# Altium PCB EMBL51537_SC_BOARD.PcbDoc (part 1 of 2)
Units mil, origin at the board's own origin, x right, y up, seen from the top; angles counter-clockwise.
Board outline 4527.6 x 6358.3 mil, 4 copper layers (TOP, L2_PWR, L3_GND, BOTTOM), stack 20.602 mil thick; 126 components, 64 nets, 342 pads, 137 vias.
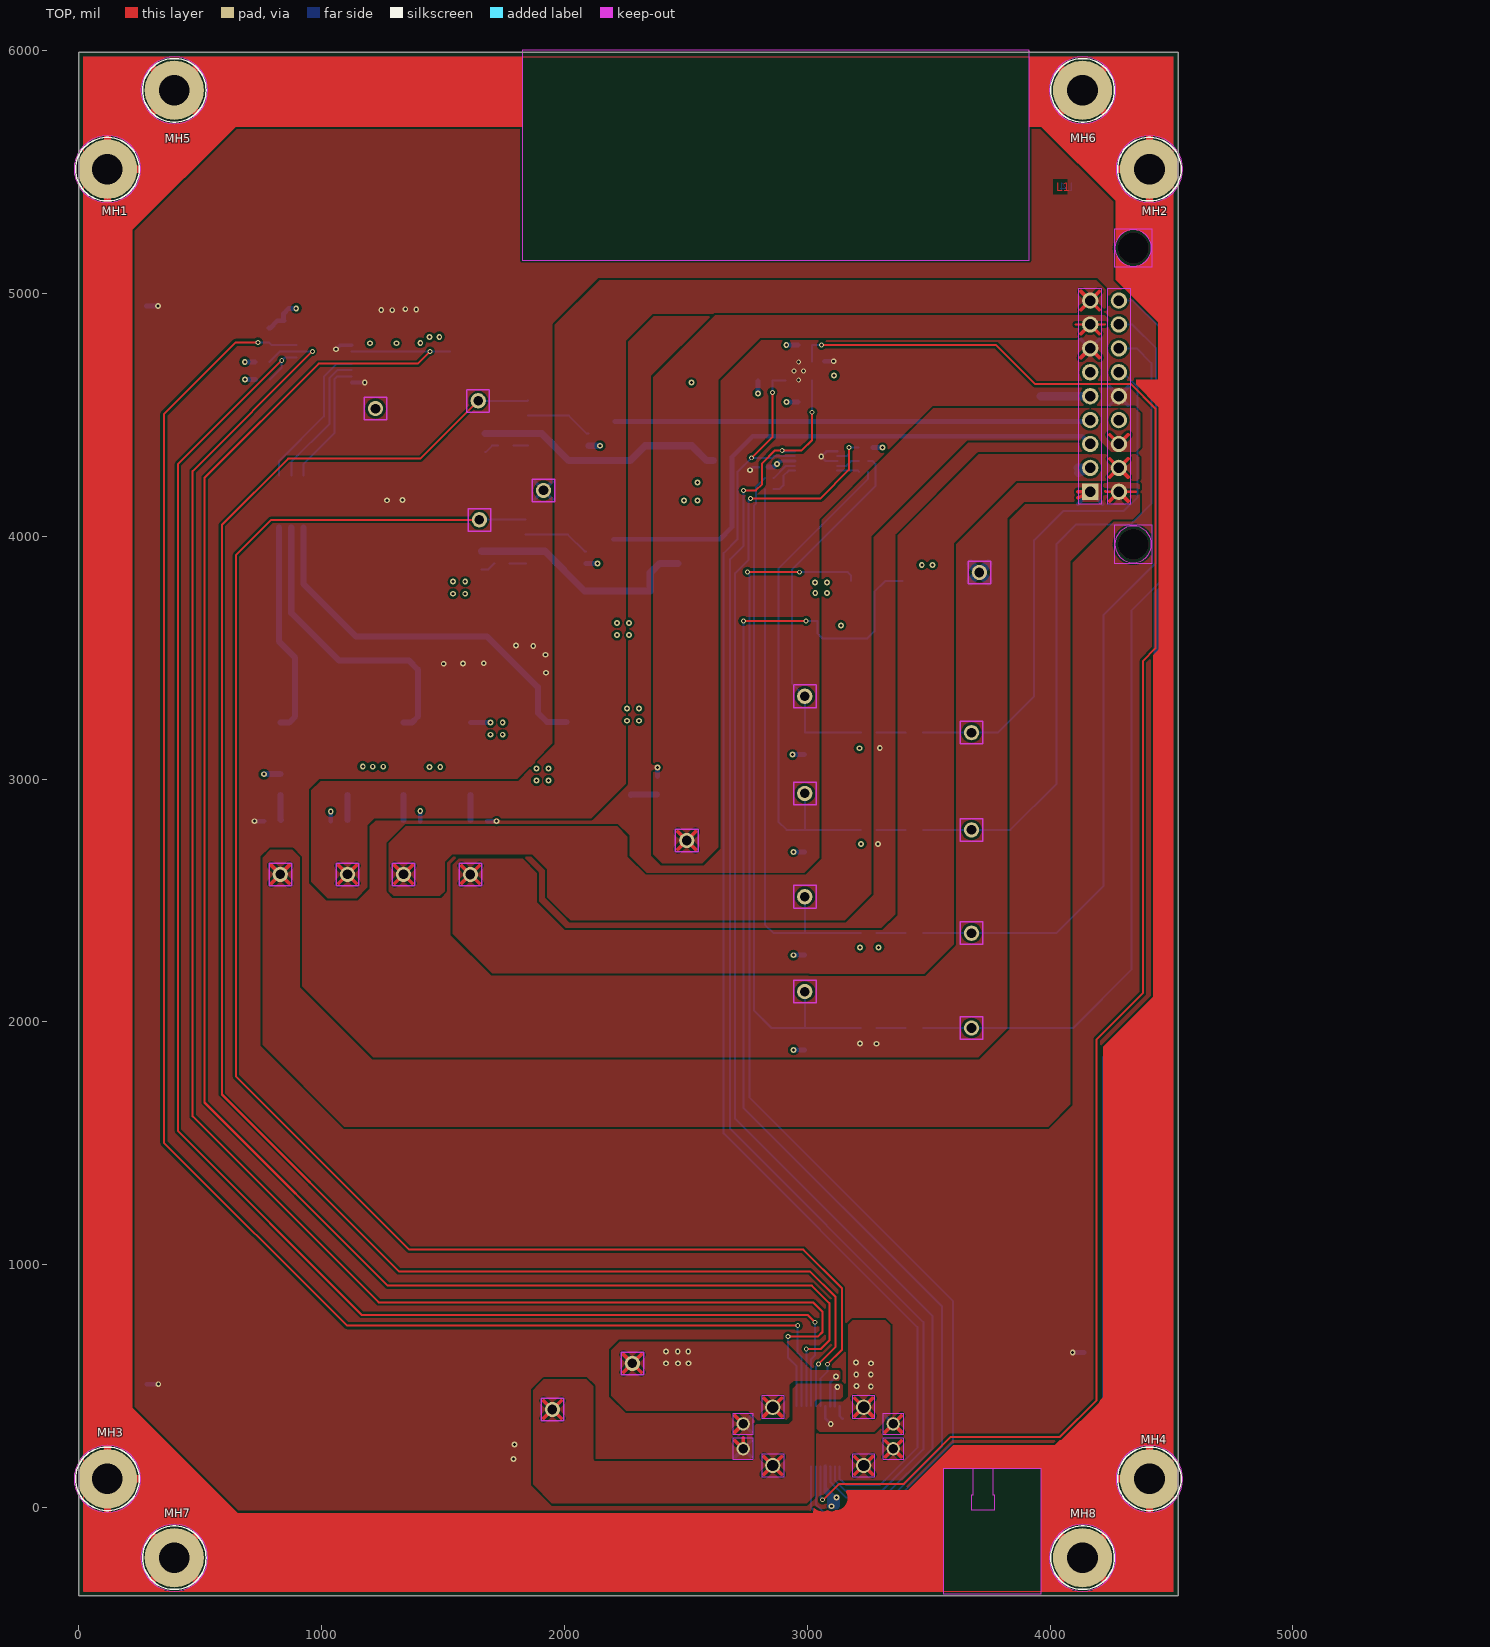
[diagram p0: TOP view]
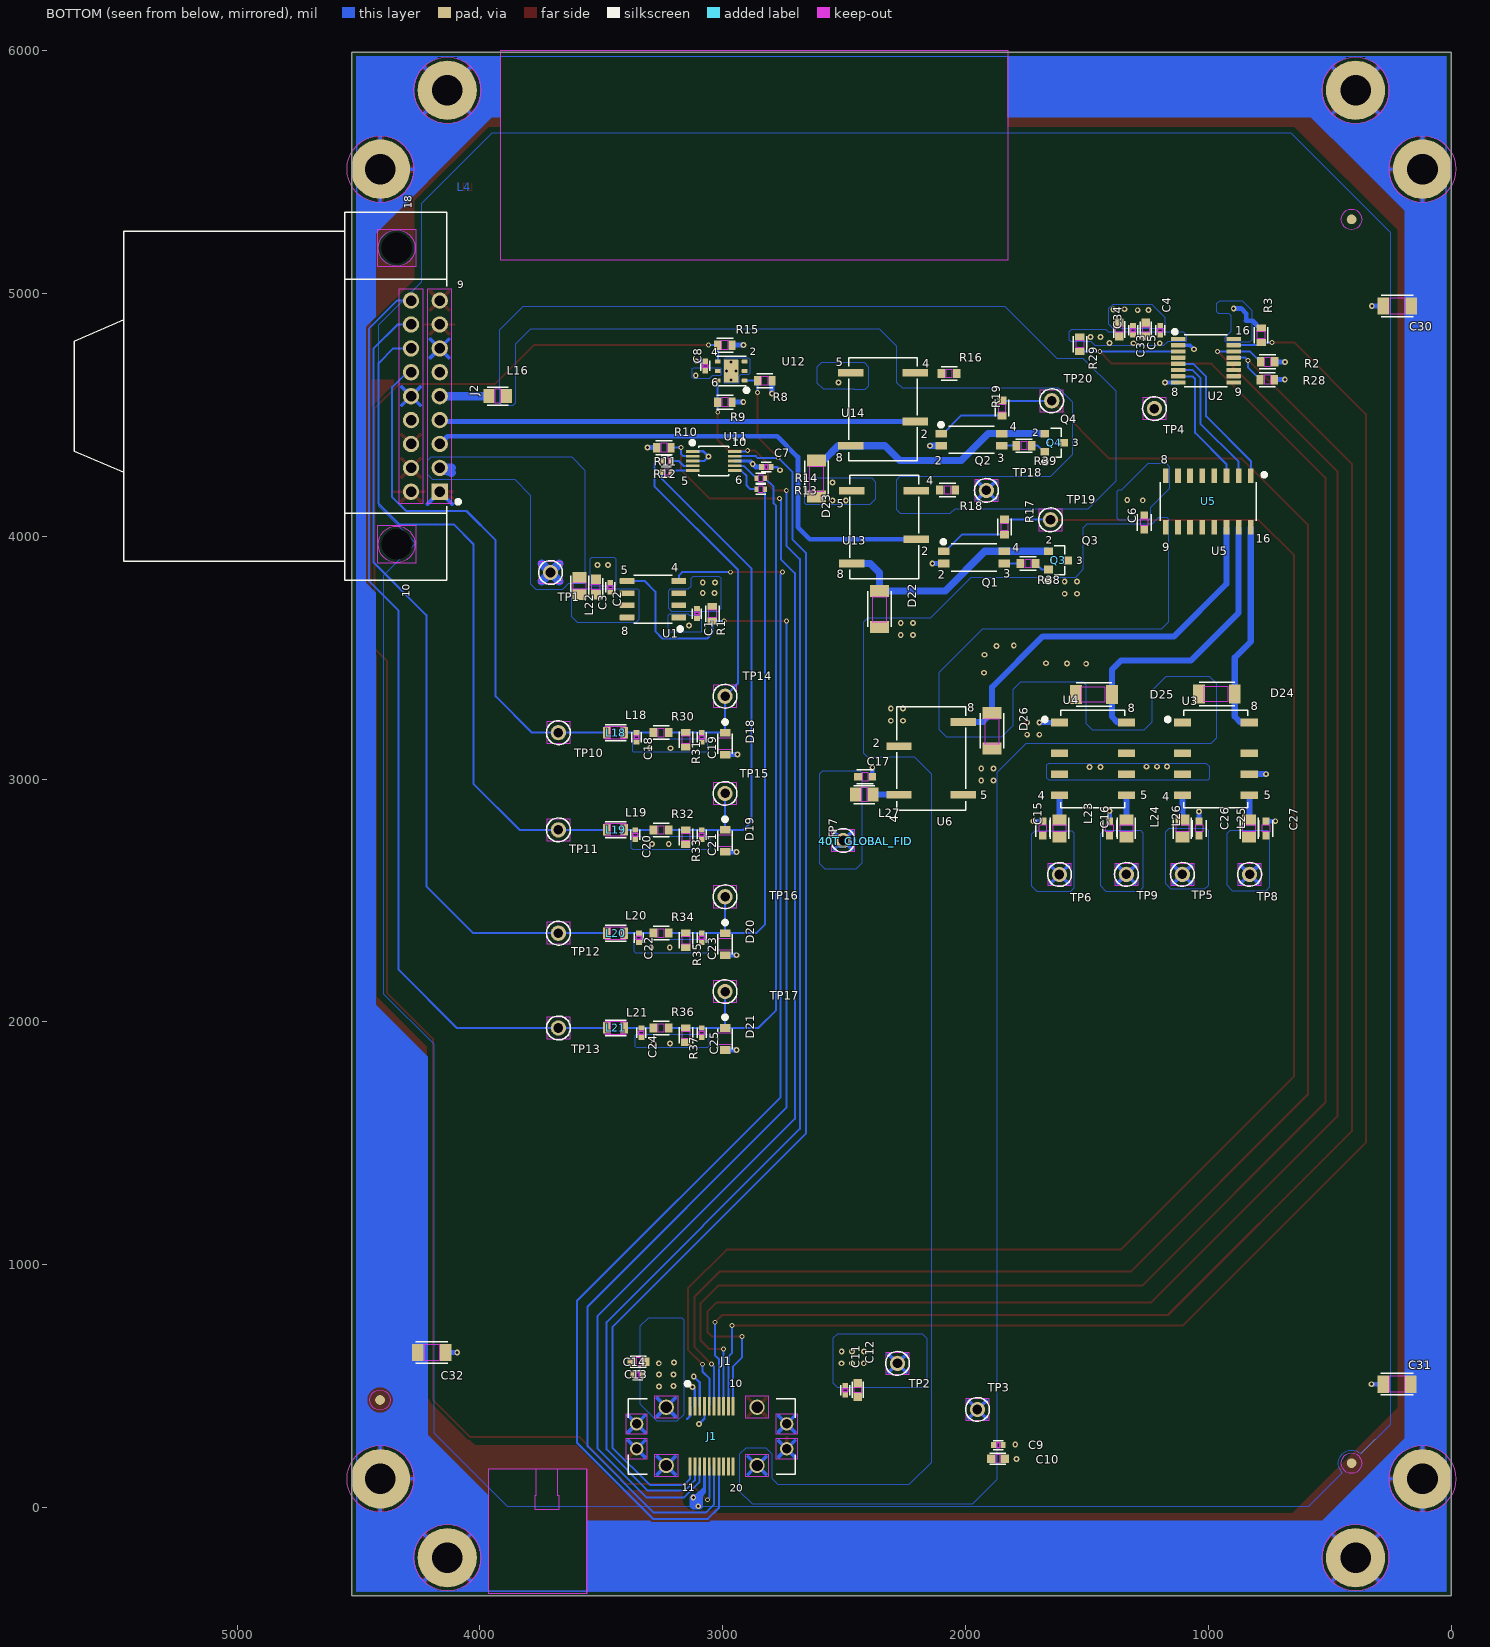
[diagram p1: BOTTOM view, seen from below]
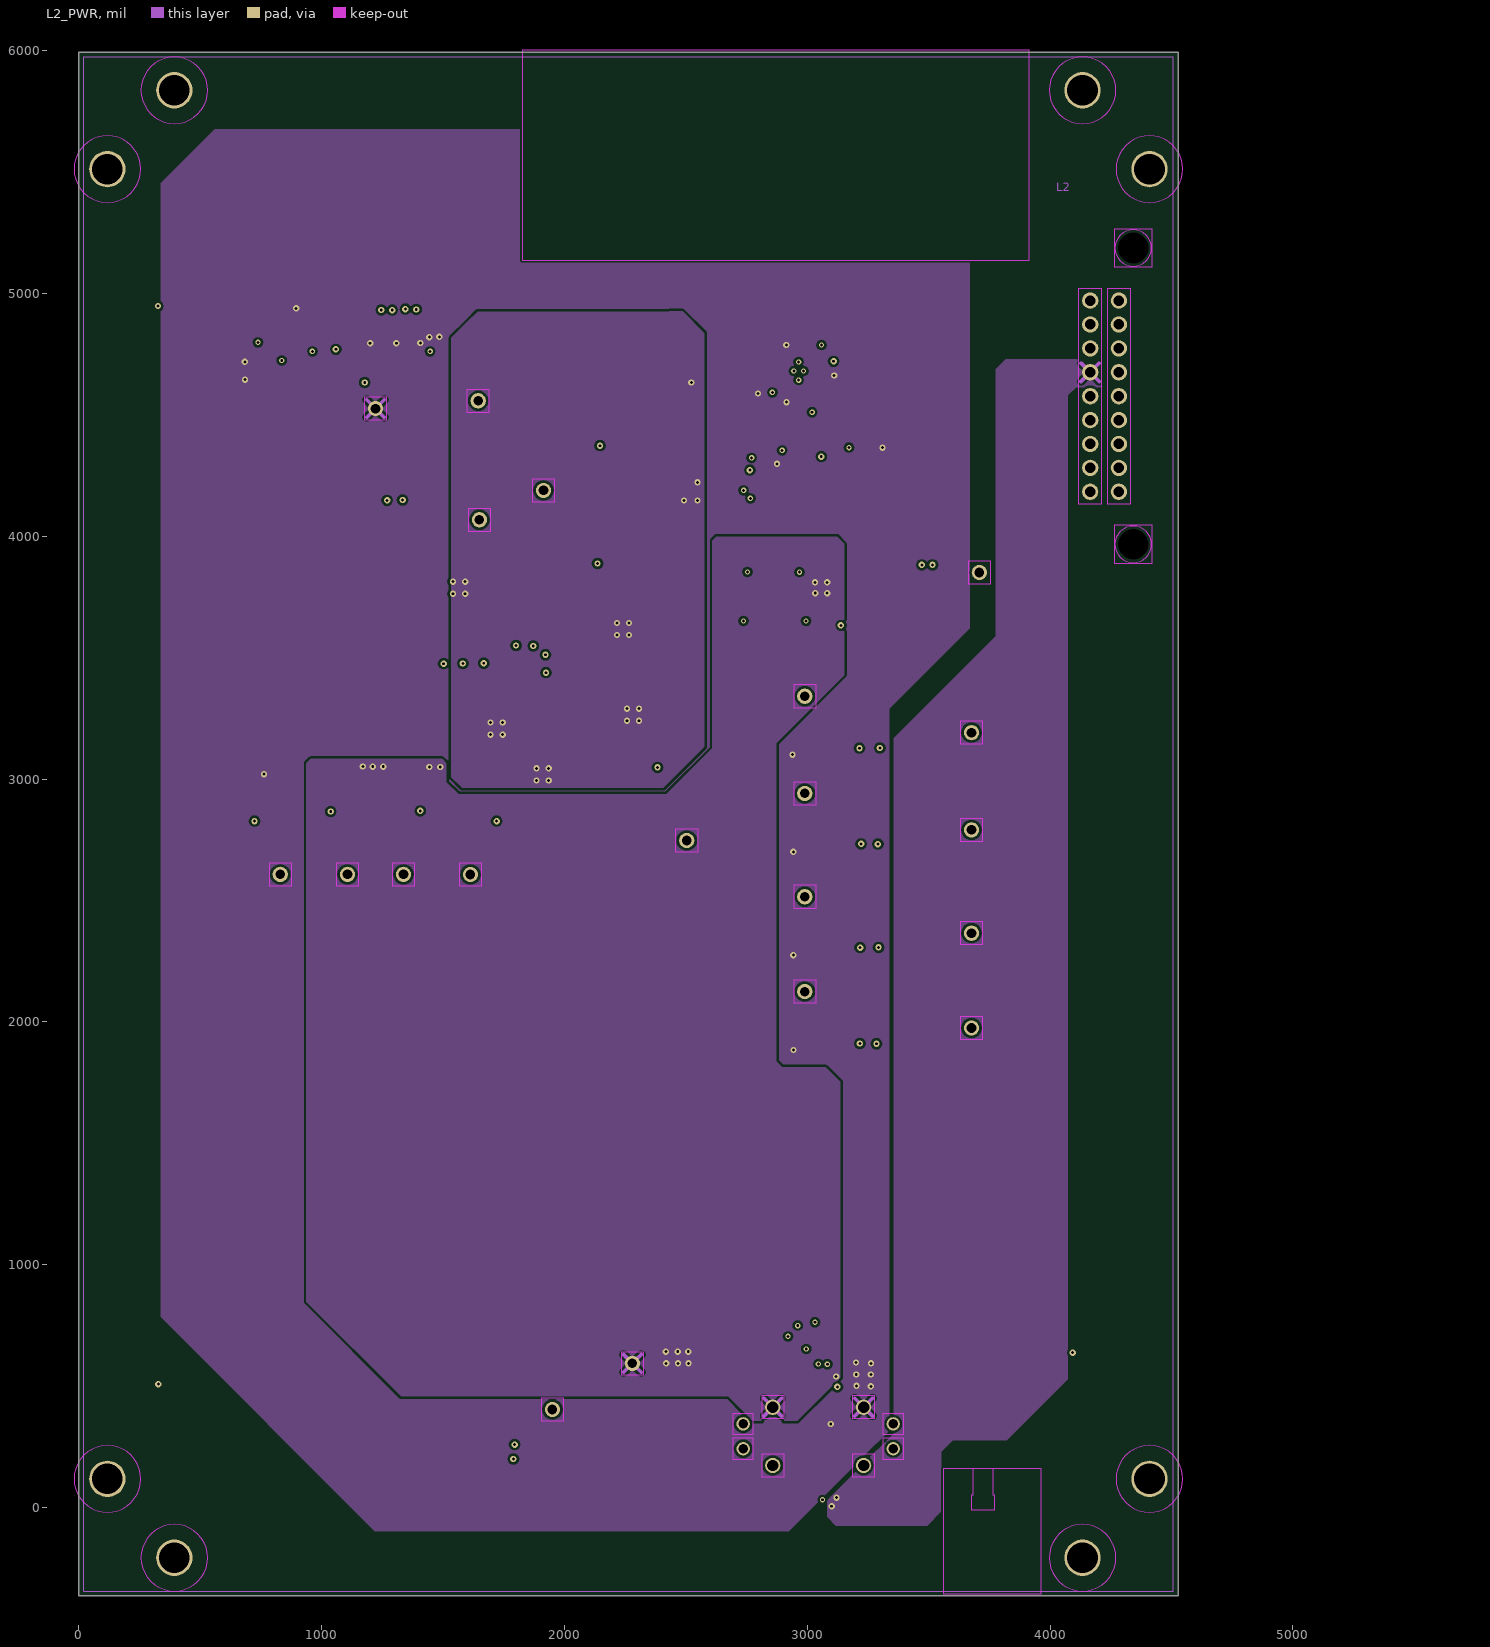
[diagram p2: L2_PWR]
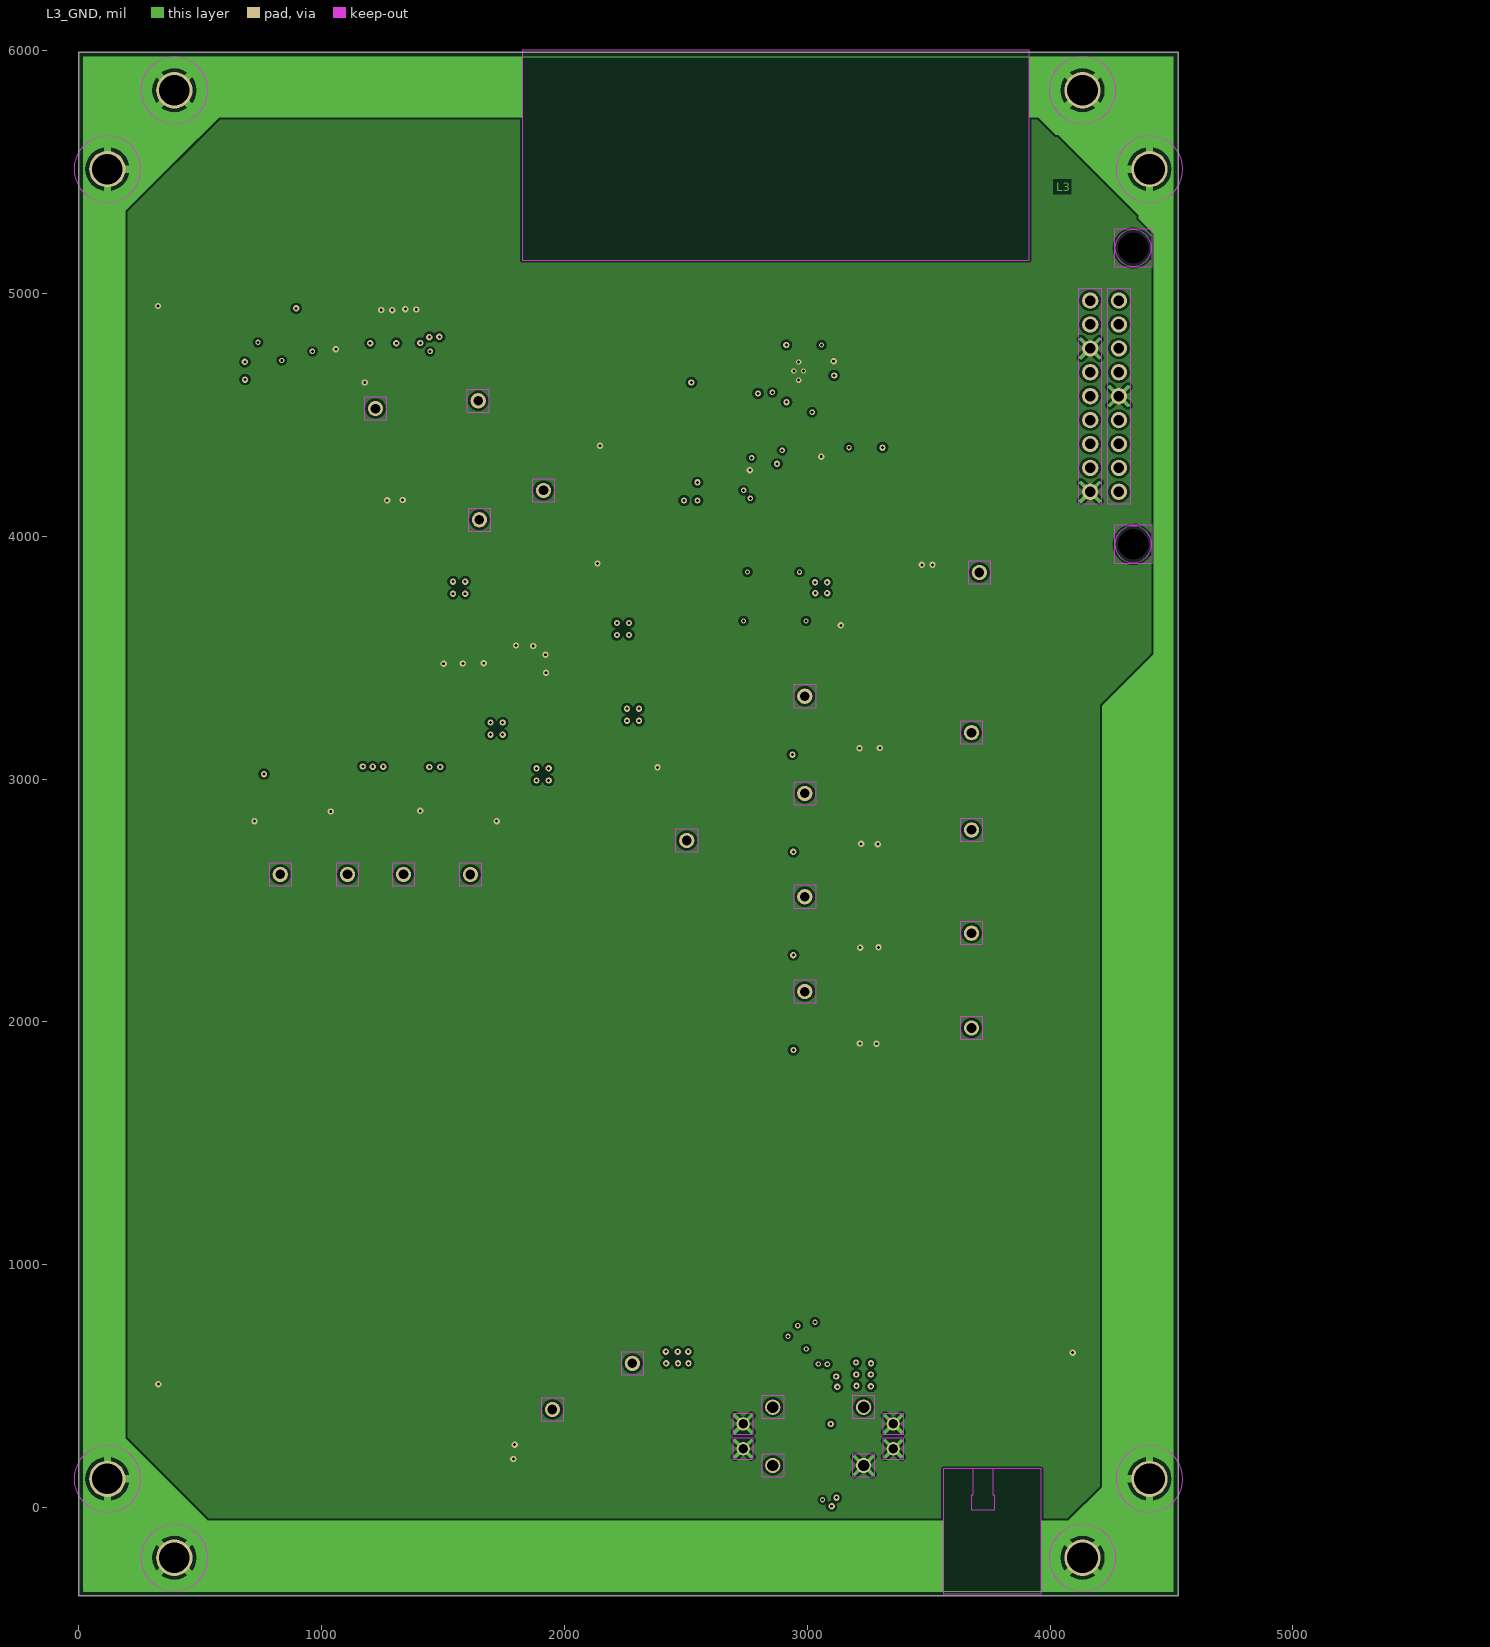
[diagram p3: L3_GND]

## Layer stack, top to bottom
Top Solder: solder mask 0.4, Solder Resist, Dk 3.5
TOP: signal copper 2.067
Dielectric 1: core 5, FR-4, Dk 3.67
L2_PWR: signal copper 1.26
Dielectric2: core 3.948, FR-4, Dk 3.55
L3_GND: signal copper 1.26
Dielectric3: core 5, FR-4, Dk 3.67
BOTTOM: signal copper 2.067
Bottom Solder: solder mask 0.4, Solder Resist, Dk 3.5

## Board outline
0,-364.17 0,5994.13 4527.6,5994.13 4527.6,-364.17

## Design rules (kind name [scope] priority, off if disabled: settings)
Clearance [All] p1: gap=10 ignorepadtopadclearanceinfootprint=FALSE except(0: Arc-Hole Track-Hole SMDPad-Hole THPad-Hole Via-Hole Fill-Hole Poly-Hole Region-Hole Text-Hole)
PlaneConnect [All] p1: planeconnectstyle=Direct reliefexpansion=20 reliefentries=4 reliefconductorwidth=10 reliefairgap=10
PolygonConnect [All] p1: connectstyle=Direct reliefconductorwidth=10 reliefentries=4 polygonreliefangle="90 Angle" airgapwidth=10
RoutingVias [All] p1: holewidth=28 width=50 viastyle="Through Hole" minholewidth=28 minwidth=50 maxholewidth=28 maxwidth=50
SolderMaskExpansion [All] p1: expansion=4 istentingtop=FALSE
Width [All] p1: maxlimit=10 minlimit=10 preferedwidth=10 impedanceprofiledriven=TRUE minimp=60.000000 maximp=60.000000 favimp=60.000000
29 further rules are at their usual default settings.

## Components (designator, comment, footprint, x,y, rotation, side; value= is the part's Value field where it differs from the comment)
40T_GLOBAL_FID "" 40T_GLOBAL_FID#1 410.1,182.75 r262.87 bottom
40T_GLOBAL_FID "" 40T_GLOBAL_FID#2 4411,443 r183.85 bottom
40T_GLOBAL_FID "" 40T_GLOBAL_FID#3 410.1,5305 r262.87 bottom
C1 "CAP_NP_78_CAPC1005X55N_A_DISCRE" CAPC1005X55N_A#1 3106.1,3681.75 r270 bottom
C2 "CAP_NP_78_CAPC1005X55N_A_DISCRE" CAPC1005X55N_A#1 3463.1,3789.75 r90 bottom
C3 "CAP_NP_78_CAPC1608X80N_A_DISCRE" CAPC1608X80N_A 3522.1,3790.75 r90 bottom
C4 "CAP_NP_78_CAPC1005X55N_A_DISCRE" CAPC1005X55N_A#1 1198.1,4848.75 r90 bottom
C5 "CAP NP_CAPC1608X90N_A_1UF" CAPC1608X90N_A#1 1257.1,4850.75 r90 bottom
C6 "CAP_NP_78_CAPC1608X90N_DISCRETE" CAPC1608X90N#1 1264.25,4057.1 r270 bottom
C7 "CAP_NP_78_CAPC1005X55N_A_DISCRE" CAPC1005X55N_A#2 2820,4285 r0 bottom
C8 "CAP_NP_78_CAPC1005X55N_A_DISCRE" CAPC1005X55N_A#1 3071.9,4701.25 r90 bottom
C9 "CAP_NP_78_CAPC1005X55N_A_DISCRE" CAPC1005X55N_A#2 1864.75,256.87 r0 bottom
C10 "CAP NP_CAPC1608X90N_A_1UF" CAPC1608X90N_A#2 1866.75,200.88 r0 bottom
C11 "CAP_NP_78_CAPC1005X55N_A_DISCRE" CAPC1005X55N_A#1 2495.1,483.75 r270 bottom
C12 "CAP NP_CAPC1608X90N_A_1UF" CAPC1608X90N_A#1 2443.1,484.75 r270 bottom
C13 "CAP_NP_78_CAPC1005X55N_A_DISCRE" CAPC1005X55N_A#1 3349.25,545.1 r0 bottom
C14 "CAP NP_CAPC1608X90N_A_1UF" CAPC1608X90N_A#1 3347.25,601.09 r0 bottom
C15 "CAP_NP_78_CAPC1608X90N_DISCRETE" CAPC1608X90N#2 1682.14,2797 r270 bottom
C16 "CAP_NP_78_CAPC1608X90N_DISCRETE" CAPC1608X90N#2 1406.55,2797 r270 bottom
C17 "CAP_NP_78_CAPC1608X90N_DISCRETE" CAPC1608X90N#2 2413.38,3009.35 r0 bottom
C18 "CAP_NP_78_CAPC1005X55N_A_DISCRE" CAPC1005X55N_A#1 3355.07,3171.85 r270 bottom
C19 "CAP_NP_78_CAPC1005X55N_A_DISCRE" CAPC1005X55N_A#1 3086.13,3171.85 r270 bottom
C20 "CAP_NP_78_CAPC1005X55N_A_DISCRE" CAPC1005X55N_A#1 3360.07,2771.46 r270 bottom
C21 "CAP_NP_78_CAPC1005X55N_A_DISCRE" CAPC1005X55N_A#1 3086.13,2771.46 r270 bottom
C22 "CAP_NP_78_CAPC1005X55N_A_DISC_1" CAPC1005X55N_A#1 3345.07,2346.07 r270 bottom
C23 "CAP_NP_78_CAPC1005X55N_A_DISC_1" CAPC1005X55N_A#1 3086.13,2346.07 r270 bottom
C24 "CAP_NP_78_CAPC1005X55N_A_DISC_1" CAPC1005X55N_A#1 3335.07,1955.67 r270 bottom
C25 "CAP_NP_78_CAPC1005X55N_A_DISC_1" CAPC1005X55N_A#1 3086.13,1955.67 r270 bottom
C26 "CAP_NP_78_CAPC1608X90N_DISCRETE" CAPC1608X90N#2 1037.81,2797 r270 bottom
C27 "CAP_NP_78_CAPC1608X90N_DISCRETE" CAPC1608X90N#2 763.01,2797 r270 bottom
C30 "CAPACITOR NON-POL_CAPC3216X180N" CAPC3216X180N_D#1 222,4948 r0 bottom
C31 "CAPACITOR NON-POL_CAPC3216X18_1" CAPC3216X180N_D#1 223,508 r0 bottom
C32 "CAPACITOR NON-POL_CAPC3216X18_1" CAPC3216X180N_D#2 4198,638 r0 bottom
C33 "CAP_NP_78_CAPC1005X55N_A_DISCRE" CAPC1005X55N_A#1 1310,4849 r90 bottom
C34 "CAP NP_CAPC1608X90N_A_1UF" CAPC1608X90N_A#1 1367,4851 r90 bottom
D18 "DIODE SCHOTTKY_SODFL2514X80N_2K" SODFL2514X80N_2K 2990.15,3145.86 r270 bottom
D19 "DIODE SCHOTTKY_SODFL2514X80N_2K" SODFL2514X80N_2K 2990.15,2745.47 r270 bottom
D20 "DIODE SCHOTTKY_SODFL2514X80N__1" SODFL2514X80N_2K 2990.14,2320.08 r270 bottom
D21 "DIODE SCHOTTKY_SODFL2514X80N__1" SODFL2514X80N_2K 2990.15,1929.68 r270 bottom
D22 "DIODE PIN_1_DIOMELF3515N_LL4148" DIOMELF3515N#1 2354,3701 r90 bottom
D23 "DIODE PIN_1_DIOMELF3515N_LL4148" DIOMELF3515N#1 2613,4238 r90 bottom
D24 "DIODE PIN_1_DIOMELF3515N_LL4148" DIOMELF3515N#2 965,3351 r0 bottom
D25 "DIODE PIN_1_DIOMELF3515N_LL4148" DIOMELF3515N#2 1471,3348 r0 bottom
D26 "DIODE PIN_1_DIOMELF3515N_LL4148" DIOMELF3515N#1 1891,3199 r90 bottom
J1 "CONN PCB 12X2-P_1_HIROSE_FX23-2" HIROSE_FX23-20S-0P5SV 3045.33,293.29 r0 bottom
J2 "MX23A18NF1_0_JAE_MX23A18NF1_MX2" JAE_MX23A18NF1 4901.12,4576.81 r270 bottom
L16 "L-33R100MHZ-3A-25%-0603_INDC201" INDC2012X105N 3926.18,4576.81 r0 bottom
L18 "L-33R100MHZ-3A-25%-0603_FB_MPZ2" FB_MPZ2012S300ATD25 3441.21,3191.14 r0 bottom
L19 "L-33R100MHZ-3A-25%-0603_FB_MPZ2" FB_MPZ2012S300ATD25 3441.21,2790.75 r0 bottom
L20 "L-33R100MHZ-3A-25%-0603_FB_MPZ2" FB_MPZ2012S300ATD25 3441.21,2365.35 r0 bottom
L21 "L-33R100MHZ-3A-25%-0603_FB_MPZ2" FB_MPZ2012S300ATD25 3441.21,1974.96 r0 bottom
L22 "L-33R100MHZ-3A-25%-0603_INDC201" INDC2012X105N 3589.1,3794.75 r90 bottom
L23 "L-33R100MHZ-3A-25%-0603_INDC2_1" INDC2012X105N 1613.05,2797 r270 bottom
L24 "L-33R100MHZ-3A-25%-0603_INDC2_1" INDC2012X105N 1337.46,2797 r270 bottom
L25 "L-33R100MHZ-3A-25%-0603_INDC2_1" INDC2012X105N 832.1,2797 r270 bottom
L26 "L-33R100MHZ-3A-25%-0603_INDC2_1" INDC2012X105N 1106.9,2797 r270 bottom
L27 "L-33R100MHZ-3A-25%-0603_INDC2_1" INDC2012X105N 2417,2936 r0 bottom
MH1 "MOUNTING HOLE_MTG320_620_MOUNTI" MTG320_620 118.1,5511.86 r270 top
MH2 "MOUNTING HOLE_MTG320_620_MOUNTI" MTG320_620 4409.5,5511.86 r270 top
MH3 "MOUNTING HOLE_MTG320_620_MOUNTI" MTG320_620 118.1,118.1 r270 top
MH4 "MOUNTING HOLE_MTG320_620_MOUNTI" MTG320_620 4409.5,118.1 r270 top
MH5 "MOUNTING HOLE_MTG320_620_MOUNTI" MTG320_620 393.69,5836.66 r270 top
MH6 "MOUNTING HOLE_MTG320_620_MOUNTI" MTG320_620 4133.91,5836.66 r270 top
MH7 "MOUNTING HOLE_MTG320_620_MOUNTI" MTG320_620 393.69,-206.7 r270 top
MH8 "MOUNTING HOLE_MTG320_620_MOUNTI" MTG320_620 4133.91,-206.7 r270 top
Q1 "TLX9000TPLF_1_OPTO_TLP293_BL-TP" OPTO_TLP293_BL-TPL_E#1 1965.1,3912.75 r270 bottom
Q2 "TLX9000TPLF_1_OPTO_TLP293_BL-TP" OPTO_TLP293_BL-TPL_E#2 1975.1,4397.75 r270 bottom
Q3 "NPN BCE_SOT95P237X122-3N_OSI_MM" SOT95P237X122-3N_OSI 1619,3900.35 r270 bottom
Q4 "NPN BCE_SOT95P237X122-3N_OSI_MM" SOT95P237X122-3N_OSI 1634,4385.35 r270 bottom
R1 "R_0_RESC1608X55N_B_DNP" RESC1608X55N_B#1 3042.1,3680.75 r270 bottom
R2 "R_0_RESC1608X55N_B_10K" RESC1608X55N_B#1 756.25,4718.04 r0 bottom
R3 "R_0_RESC1608X55N_B_10K" RESC1608X55N_B#1 782.99,4827.75 r270 bottom
R8 "R_0_RESC1608X55N_B_10K" RESC1608X55N_B#1 2826.9,4640.25 r0 bottom
R9 "R_0_RESC1608X55N_B_10K" RESC1608X55N_B#1 2990.9,4552.25 r0 bottom
R10 "R_0_RESC1608X55N_B_10K" RESC1608X55N_B#2 3241.75,4364.9 r0 bottom
R11 "RES_57_RESC1005X40N_A_DISCRETE_" RESC1005X40N_A#1 3231.75,4309.9 r0 bottom
R12 "RES_57_RESC1005X40N_A_DISCRETE_" RESC1005X40N_A#1 3231.75,4264.9 r0 bottom
R13 "RES_57_RESC1005X40N_A_DISCRETE_" RESC1005X40N_A#2 2843.75,4193.9 r0 bottom
R14 "RES_57_RESC1005X40N_A_DISCRETE_" RESC1005X40N_A#2 2843.75,4238.9 r0 bottom
R15 "R_0_RESC1608X55N_B_10K" RESC1608X55N_B#2 2990.9,4787.25 r0 bottom
R16 "RES_57_RESC1608X55N_A_DISCRETE_" RESC1608X55N_A#1 2067.1,4670.75 r0 bottom
R17 "RES_57_RESC1608X55N_A_DISCRET_1" RESC1608X55N_A#2 1840.1,4037.75 r90 bottom
R18 "RES_57_RESC1608X55N_A_DISCRETE_" RESC1608X55N_A#2 2074.1,4189.75 r0 bottom
R19 "RES_57_RESC1608X55N_A_DISCRET_1" RESC1608X55N_A#2 1850.1,4527.75 r90 bottom
R28 "R_0_RESC1608X55N_B_10K" RESC1608X55N_B#1 757.25,4645.1 r0 bottom
R29 "R_0_RESC1608X55N_B_10K" RESC1608X55N_B#1 1528.71,4790.66 r270 bottom
R30 "R_0_RESC1608X55N_A_47K" RESC1608X55N_A#1 3253.1,3191.14 r0 bottom
R31 "R_0_RESC1608X55N_B_10K" RESC1608X55N_B#1 3151.21,3161.61 r270 bottom
R32 "R_0_RESC1608X55N_A_47K" RESC1608X55N_A#1 3253.1,2790.75 r0 bottom
R33 "R_0_RESC1608X55N_B_10K" RESC1608X55N_B#1 3151.21,2761.22 r270 bottom
R34 "R_0_RESC1608X55N_A_DNP" RESC1608X55N_A#1 3253.1,2365.35 r0 bottom
R35 "R_0_RESC1608X55N_B_DNP" RESC1608X55N_B#1 3151.21,2335.83 r270 bottom
R36 "R_0_RESC1608X55N_A_DNP" RESC1608X55N_A#1 3253.1,1974.96 r0 bottom
R37 "R_0_RESC1608X55N_B_DNP" RESC1608X55N_B#1 3151.21,1945.43 r270 bottom
R38 "RES_57_RESC1608X55N_A_DISCRET_2" RESC1608X55N_A#2 1743,3887.75 r0 bottom
R39 "RES_57_RESC1608X55N_A_DISCRET_2" RESC1608X55N_A#2 1759,4372.75 r0 bottom
TP1 "T POINT R_TPC160H100_T POINT R" TPC160H100 3709.1,3850.75 r0 bottom
TP2 "T POINT R_TPC160H100_T POINT R" TPC160H100 2280.1,593.75 r0 bottom
TP3 "T POINT R_TPC160H100_T POINT R" TPC160H100 1950.75,403.9 r90 bottom
TP4 "T POINT R_TPC160H100_T POINT R" TPC160H100 1222.1,4525.75 r0 bottom
TP5 "T POINT R_TPC160H100_T POINT R" TPC160H100 1106.9,2607.5 r0 bottom
TP6 "T POINT R_TPC160H100_T POINT R" TPC160H100 1613.05,2606.96 r0 bottom
TP7 "T POINT R_TPC160H100_T POINT R" TPC160H100 2503.87,2747.1 r270 bottom
TP8 "T POINT R_TPC160H100_T POINT R" TPC160H100 830.1,2607.5 r0 bottom
TP9 "T POINT R_TPC160H100_T POINT R" TPC160H100 1337.46,2607.5 r0 bottom
TP10 "T POINT R_TPC160H100_T POINT R" TPC160H100 3676.64,3191.14 r0 bottom
TP11 "T POINT R_TPC160H100_T POINT R" TPC160H100 3676.64,2790.75 r0 bottom
TP12 "T POINT R_TPC160H100_T POINT R" TPC160H100 3676.64,2365.35 r0 bottom
TP13 "T POINT R_TPC160H100_T POINT R" TPC160H100 3676.64,1974.96 r0 bottom
TP14 "T POINT R_TPC160H100_T POINT R" TPC160H100 2990.15,3341.14 r0 bottom
TP15 "T POINT R_TPC160H100_T POINT R" TPC160H100 2990.15,2940.75 r0 bottom
TP16 "T POINT R_TPC160H100_T POINT R" TPC160H100 2990.14,2515.35 r0 bottom
TP17 "T POINT R_TPC160H100_T POINT R" TPC160H100 2990.15,2124.96 r0 bottom
TP18 "T POINT R_TPC160H100_T POINT R" TPC160H100 1914.1,4188.75 r0 bottom
TP19 "T POINT R_TPC160H100_T POINT R" TPC160H100 1650.1,4067.75 r0 bottom
TP20 "T POINT R_TPC160H100_T POINT R" TPC160H100 1645.1,4557.75 r0 bottom
U1 "TPS2024IDRQ1_0_SOIC127P600X175-" SOIC127P600X175-8N_TI 3287.1,3740.75 r90 bottom
U2 "TCA6408AQPWRQ1_1_TSSOP65P640X12" TSSOP65P640X120-16N_B 1010.1,4722.75 r0 bottom
U3 "RELAY_DPDT_NB_0_RELAY_G6K-2F-Y-" RELAY_G6K-2F-Y-DC12#1 969.11,3083.1 r270 bottom
U4 "RELAY_DPDT_NB_0_RELAY_G6K-2F-Y-" RELAY_G6K-2F-Y-DC12#2 1475.25,3083.1 r270 bottom
U5 "TPL7407LADR_0_SOIC127P600X175-1" SOIC127P600X175-16N_TI 1000.25,4143.1 r0 bottom
U6 "RELAY_SPDT_B_0_RELAY_G6L-1F-DC1" RELAY_G6L-1F-DC12 2141.2,3085.1 r270 bottom
U11 "ADS1015IDGSR_1_VSSOP50P490X110-" VSSOP50P490X110-10N 3036.75,4309.9 r0 bottom
U12 "HDC2021DEBT_2_WSON100P300X300X9" WSON100P300X300X92-7N 2964.9,4680.25 r0 bottom
U13 "RELAY_SPDT_B_0_RELAY_G6L-1F-DC1" RELAY_G6L-1F-DC12 2335.1,4037.75 r90 bottom
U14 "RELAY_SPDT_B_0_RELAY_G6L-1F-DC1" RELAY_G6L-1F-DC12 2340.1,4522.75 r90 bottom

## Footprints (in the part's own frame and the unit in brackets; to place one, negate y for a bottom-side part, rotate by r counter-clockwise, add the part's x,y. Pads: shape width x height; smd on the part's side, far side on the other; paste and mask are expansions set on the pad)
40T_GLOBAL_FID#1 [mil] "40T_GLOBAL_FID"
  round 40 smd: ""(-5082.62,635.96) ""(-754.97,-3937.63) ""(0,0)
  TOP keep-out region: -5.24,-41.88 -15.9,-39.1 -25.48,-33.65 -33.32,-25.91 -38.89,-16.4 -41.81,-5.78 -41.88,5.24 -39.1,15.9 -33.65,25.48 -33.65,25.48 -25.91,33.32 -16.4,38.89 -5.78,41.81 5.24,41.88 15.9,39.1 25.48,33.65 33.32,25.91 38.89,16.4 38.89,16.4 41.81,5.78 41.88,-5.24 39.1,-15.9 33.65,-25.48 25.91,-33.32 16.4,-38.89 5.78,-41.81 -5.24,-41.88
  TOP keep-out region: -760.21,-3979.52 -770.88,-3976.74 -780.45,-3971.29 -788.3,-3963.55 -793.87,-3954.04 -796.79,-3943.41 -796.86,-3932.39 -794.07,-3921.73 -788.63,-3912.15 -788.63,-3912.15 -780.88,-3904.31 -771.38,-3898.74 -760.75,-3895.82 -749.73,-3895.75 -739.07,-3898.53 -729.49,-3903.98 -721.65,-3911.72 -716.08,-3921.23 -716.08,-3921.23 -713.16,-3931.86 -713.09,-3942.88 -715.87,-3953.54 -721.32,-3963.12 -729.06,-3970.96 -738.57,-3976.53 -749.19,-3979.45 -760.21,-3979.52
  TOP keep-out region: -5087.86,594.07 -5098.52,596.86 -5108.1,602.3 -5115.94,610.05 -5121.51,619.55 -5124.43,630.18 -5124.5,641.2 -5121.72,651.86 -5116.27,661.44 -5116.27,661.44 -5108.53,669.28 -5099.02,674.85 -5088.4,677.77 -5077.38,677.84 -5066.72,675.06 -5057.14,669.61 -5049.3,661.87 -5043.73,652.36 -5043.73,652.36 -5040.81,641.73 -5040.74,630.72 -5043.52,620.05 -5048.97,610.48 -5056.71,602.63 -5066.22,597.06 -5076.84,594.14 -5087.86,594.07
  body extent -5125,-3980 42,678, height 150
40T_GLOBAL_FID#2 [mil] "40T_GLOBAL_FID"
  round 40 smd: ""(0,0) ""(3665.59,5119.54) ""(4009.35,8.83)
  TOP keep-out region: 3967.23,6 3967.93,17 3971.46,27.44 3977.56,36.61 3985.84,43.89 3995.71,48.78 4006.52,50.95 4017.51,50.25 4027.95,46.72 4027.95,46.72 4037.13,40.62 4044.4,32.35 4049.3,22.47 4051.46,11.67 4050.76,0.67 4047.24,-9.77 4041.13,-18.94 4032.86,-26.22 4032.86,-26.22 4022.98,-31.11 4012.18,-33.28 4001.18,-32.58 3990.74,-29.06 3981.57,-22.95 3974.29,-14.68 3969.4,-4.8 3967.23,6
  TOP keep-out region: -42.12,-2.83 -41.41,8.16 -37.89,18.6 -31.78,27.78 -23.51,35.06 -13.64,39.95 -2.83,42.12 8.16,41.41 18.6,37.89 18.6,37.89 27.78,31.78 35.06,23.51 39.95,13.64 42.12,2.83 41.41,-8.16 37.89,-18.6 31.78,-27.78 23.51,-35.06 23.51,-35.06 13.64,-39.95 2.83,-42.12 -8.16,-41.41 -18.6,-37.89 -27.78,-31.78 -35.06,-23.51 -39.95,-13.64 -42.12,-2.83
  TOP keep-out region: 3623.48,5116.71 3624.18,5127.7 3627.7,5138.14 3633.81,5147.32 3642.08,5154.6 3651.96,5159.49 3662.76,5161.65 3673.76,5160.95 3684.2,5157.43 3684.2,5157.43 3693.37,5151.32 3700.65,5143.05 3705.54,5133.18 3707.71,5122.37 3707.01,5111.37 3703.48,5100.93 3697.38,5091.76 3689.11,5084.48 3689.11,5084.48 3679.23,5079.59 3668.43,5077.42 3657.43,5078.12 3646.99,5081.65 3637.82,5087.76 3630.54,5096.03 3625.65,5105.9 3623.48,5116.71
  body extent -42,-42 4051,5162, height 150
40T_GLOBAL_FID#3 [mil] "40T_GLOBAL_FID"
  round 40 smd: ""(0,0) ""(4327.65,-4573.59) ""(5082.62,-635.96)
  TOP keep-out region: 5077.38,-677.84 5066.72,-675.06 5057.14,-669.61 5049.3,-661.87 5043.73,-652.36 5040.81,-641.73 5040.74,-630.72 5043.52,-620.05 5048.97,-610.48 5048.97,-610.48 5056.71,-602.63 5066.22,-597.06 5076.84,-594.14 5087.86,-594.07 5098.52,-596.86 5108.1,-602.3 5115.94,-610.05 5121.51,-619.55 5121.51,-619.55 5124.43,-630.18 5124.5,-641.2 5121.72,-651.86 5116.27,-661.44 5108.53,-669.28 5099.02,-674.85 5088.4,-677.77 5077.38,-677.84
  TOP keep-out region: 4322.41,-4615.48 4311.74,-4612.69 4302.17,-4607.24 4294.32,-4599.5 4288.75,-4589.99 4285.83,-4579.37 4285.76,-4568.35 4288.55,-4557.69 4293.99,-4548.11 4293.99,-4548.11 4301.74,-4540.27 4311.24,-4534.7 4321.87,-4531.78 4332.89,-4531.71 4343.55,-4534.49 4353.13,-4539.94 4360.97,-4547.68 4366.54,-4557.19 4366.54,-4557.19 4369.46,-4567.81 4369.53,-4578.83 4366.75,-4589.49 4361.3,-4599.07 4353.56,-4606.91 4344.05,-4612.48 4333.43,-4615.4 4322.41,-4615.48
  TOP keep-out region: -5.24,-41.88 -15.9,-39.1 -25.48,-33.65 -33.32,-25.91 -38.89,-16.4 -41.81,-5.78 -41.88,5.24 -39.1,15.9 -33.65,25.48 -33.65,25.48 -25.91,33.32 -16.4,38.89 -5.78,41.81 5.24,41.88 15.9,39.1 25.48,33.65 33.32,25.91 38.89,16.4 38.89,16.4 41.81,5.78 41.88,-5.24 39.1,-15.9 33.65,-25.48 25.91,-33.32 16.4,-38.89 5.78,-41.81 -5.24,-41.88
  body extent -42,-4615 5125,42, height 150
CAPC1005X55N_A#1 [mm] "CAPC1005X55N_A"
  rect 0.55x0.62 smd: 1(-0.49,0) 2(0.49,0)
  TOP keep-out region: -0.15,-0.25 -0.15,0.25 0.15,0.25 0.15,-0.25
  TOP keep-out region: -0.15,-0.25 0.15,-0.25 0.15,0.25 -0.15,0.25
  silkscreen extent -0.52,-0.47 0.53,0.48, body extent -1.03,-0.57 1.03,0.57, height 3.81
CAPC1005X55N_A#2 [mm] "CAPC1005X55N_A"
  rect 0.55x0.62 smd: 1(0.49,0) 2(-0.49,0)
  TOP keep-out region: 0.15,0.25 0.15,-0.25 -0.15,-0.25 -0.15,0.25
  TOP keep-out region: 0.15,0.25 -0.15,0.25 -0.15,-0.25 0.15,-0.25
  silkscreen extent -0.53,-0.48 0.52,0.47, body extent -1.03,-0.57 1.03,0.57, height 3.81
CAPC1608X80N_A [mm] "CAPC1608X80N_A"
  rect 1x1.05 smd: 1(-0.8,0) 2(0.8,0)
  TOP keep-out region: -0.224,0.474 -0.224,-0.474 0.223,-0.474 0.223,0.474
  silkscreen extent -0.92,-0.72 0.92,0.72, body extent -1.55,-0.8 1.55,0.8, height 3.81
CAPC1608X90N#1 [mm] "CAPC1608X90N"
  rect 0.8x0.75 smd: 1(-0.75,0) 2(0.75,0)
  TOP keep-out region: -0.314,-0.434 0.292,-0.434 0.292,0.437 -0.314,0.437
  silkscreen extent -0.88,-0.73 0.88,0.73, body extent -1.4,-0.75 1.4,0.75, height 3.81
CAPC1608X90N#2 [mm] "CAPC1608X90N"
  rect 0.8x0.75 smd: 1(-0.75,0) 2(0.75,0)
  TOP lines w0.508: -0.75,0 -0.75,-0.985
  TOP keep-out region: -0.314,-0.434 0.292,-0.434 0.292,0.437 -0.314,0.437
  silkscreen extent -0.88,-0.73 0.88,0.73, body extent -1.4,-0.75 1.4,0.75, height 3.81
CAPC1608X90N_A#1 [mm] "CAPC1608X90N_A"
  rect 0.9x0.9 smd: 1(-0.7,0) 2(0.7,0)
  TOP keep-out region: -0.239,0.407 -0.239,-0.412 0.234,-0.412 0.234,0.407
  silkscreen extent -0.85,-0.58 0.85,0.58, body extent -1.4,-0.72 1.4,0.72, height 3.81
CAPC1608X90N_A#2 [mm] "CAPC1608X90N_A"
  rect 0.9x0.9 smd: 1(0.7,0) 2(-0.7,0)
  TOP keep-out region: 0.239,-0.407 0.239,0.412 -0.234,0.412 -0.234,-0.407
  silkscreen extent -0.85,-0.58 0.85,0.58, body extent -1.4,-0.72 1.4,0.72, height 3.81
CAPC3216X180N_D#1 [mm] "CAPC3216X180N_D"
  rect 1.2x1.8 smd: 1(-1.45,0) 2(1.45,0)
  TOP lines w0.508: 1.45,0 2.66,0
  TOP keep-out region: -0.81,0.81 -0.81,-0.81 0.81,-0.81 0.81,0.81
  silkscreen extent -1.68,-1.12 1.68,1.12, body extent -2.3,-1.15 2.3,1.15, height 3.81
CAPC3216X180N_D#2 [mm] "CAPC3216X180N_D"
  rect 1.2x1.8 smd: 1(1.45,0) 2(-1.45,0)
  TOP lines w0.508: -2.66,0 -1.45,0
  TOP keep-out region: 0.81,-0.81 0.81,0.81 -0.81,0.81 -0.81,-0.81
  silkscreen extent -1.68,-1.12 1.68,1.12, body extent -2.3,-1.15 2.3,1.15, height 3.81
DIOMELF3515N#1 [mm] "DIOMELF3515N"
  rect 1.25x2 smd: 1(-1.875,0) 2(1.875,0)
  TOP keep-out region: -1.35,0.75 -1.35,-0.75 1.2,-0.75 1.2,0.75
  silkscreen extent -1.85,-1.22 1.85,3.04, body extent -2.75,-1.25 2.75,1.25, height 3.81
DIOMELF3515N#2 [mm] "DIOMELF3515N"
  rect 1.25x2 smd: 1(1.875,0) 2(-1.875,0)
  TOP keep-out region: 1.35,-0.75 1.35,0.75 -1.2,0.75 -1.2,-0.75
  silkscreen extent -1.85,-3.04 1.85,1.22, body extent -2.75,-1.25 2.75,1.25, height 3.81
FB_MPZ2012S300ATD25 [mm] "FB_MPZ2012S300ATD25"
  rect 0.8x1.2 smd: 1(0.9,0) 2(-0.9,0)
  TOP keep-out region: 1.07,-0.69 -1.07,-0.69 -1.07,-0.61 -0.49,-0.61 -0.49,0.61 -1.07,0.61 -1.07,0.69 1.07,0.69 1.07,0.61 0.49,0.61 0.49,-0.61 1.07,-0.61
  silkscreen extent -1.1,-0.82 1.1,0.82, body extent -1.55,-1 1.55,1, height 3.81
HIROSE_FX23-20S-0P5SV [mm] "HIROSE_FX23-20S-0P5SV"
  rect 0.3x1.9 smd: 1(2.25,-3.15) 2(1.75,-3.15) 3(1.25,-3.15) 4(0.75,-3.15) 5(0.25,-3.15) 6(-0.25,-3.15) 7(-0.75,-3.15) 8(-1.25,-3.15) 9(-1.75,-3.15) 10(-2.25,-3.15) 11(2.25,3.15) 12(1.75,3.15) 13(1.25,3.15) 14(0.75,3.15) 15(0.25,3.15) 16(-0.25,3.15) 17(-0.75,3.15) 18(-1.25,3.15) 19(-1.75,3.15) 20(-2.25,3.15)
  round 1.6 hole 1.2: P1(4.75,-3.05) P2(-4.75,-3.05) P3(4.75,3.05) P4(-4.75,3.05)
  round 1.4 hole 1: SH1(7.85,-1.3) SH2(-7.85,-1.3) SH3(7.85,1.3) SH4(-7.85,1.3)
  BOTTOM keep-out region: 8.931,-0.219 8.931,-2.381 6.769,-2.381 6.769,-0.219
  BOTTOM keep-out region: 8.931,2.381 8.931,0.219 6.769,0.219 6.769,2.381
  BOTTOM keep-out region: 5.931,4.231 5.931,1.869 3.569,1.869 3.569,4.231
  BOTTOM keep-out region: -3.569,4.231 -3.569,1.869 -5.931,1.869 -5.931,4.231
  BOTTOM keep-out region: -6.769,2.381 -6.769,0.219 -8.931,0.219 -8.931,2.381
  BOTTOM keep-out region: -6.769,-0.219 -6.769,-2.381 -8.931,-2.381 -8.931,-0.219
  BOTTOM keep-out region: -3.569,-1.869 -3.569,-4.231 -5.931,-4.231 -5.931,-1.869
  BOTTOM keep-out region: 5.931,-1.869 5.931,-4.231 3.569,-4.231 3.569,-1.869
  Multi-Layer keep-out region: -6.769,2.381 -6.769,0.219 -8.931,0.219 -8.931,2.381
  Multi-Layer keep-out region: -6.769,-0.219 -6.769,-2.381 -8.931,-2.381 -8.931,-0.219
  Multi-Layer keep-out region: 8.931,-0.219 8.931,-2.381 6.769,-2.381 6.769,-0.219
  Multi-Layer keep-out region: 8.931,2.381 8.931,0.219 6.769,0.219 6.769,2.381
  Multi-Layer keep-out region: -3.569,-1.869 -3.569,-4.231 -5.931,-4.231 -5.931,-1.869
  Multi-Layer keep-out region: 5.931,-1.869 5.931,-4.231 3.569,-4.231 3.569,-1.869
  Multi-Layer keep-out region: 5.931,4.231 5.931,1.869 3.569,1.869 3.569,4.231
  Multi-Layer keep-out region: -3.569,4.231 -3.569,1.869 -5.931,1.869 -5.931,4.231
  silkscreen extent -8.75,-5.7 8.75,3.95, body extent -10.05,-5.37 10.04,5.37, height 3.81
INDC2012X105N [mm] "INDC2012X105N"
  rect 1.15x1.45 smd: 1(-0.9,0) 2(0.9,0)
  TOP keep-out region: -0.3,0.7 -0.3,-0.7 0.3,-0.7 0.3,0.7
  silkscreen extent -1.1,-0.95 1.1,0.95, body extent -1.72,-1 1.72,1, height 3.81
JAE_MX23A18NF1 [mm] "JAE_MX23A18NF1"
  rect 1.7x1.7 / inner round 1.7 / far side rect 1.7x1.7 hole 1.1: 1(10,18.687)
  round 1.71 hole 1.1: 2(7.5,18.687) 3(5,18.687) 4(2.5,18.687) 5(0,18.687) 6(-2.5,18.687) 7(-5,18.687) 8(-7.5,18.687) 9(-10,18.687) 10(10,15.687) 11(7.5,15.687) 12(5,15.687) 13(2.5,15.687) 14(0,15.687) 15(-2.5,15.687) 16(-5,15.687) 17(-7.5,15.687) 18(-10,15.687)
  round 1 hole 3.2 unplated: ""(-15.5,14.188) ""(15.5,14.188)
  BOTTOM keep-out region: -11.231,14.456 -11.231,16.918 11.231,16.918 11.231,14.456
  BOTTOM keep-out region: -11.231,17.456 -11.231,19.919 11.231,19.919 11.231,17.456
  BOTTOM keep-out region: 13.519,12.207 13.519,16.168 17.481,16.168 17.481,12.207
  BOTTOM keep-out region: -17.481,12.207 -17.481,16.168 -13.519,16.168 -13.519,12.207
  Multi-Layer keep-out region: -11.231,14.456 -11.231,16.918 11.231,16.918 11.231,14.456
  Multi-Layer keep-out region: -11.231,17.456 -11.231,19.919 11.231,19.919 11.231,17.456
  Multi-Layer keep-out region: 13.519,12.207 13.519,16.168 17.481,16.168 17.481,12.207
  Multi-Layer keep-out region: -17.481,12.207 -17.481,16.168 -13.519,16.168 -13.519,12.207
  Multi-Layer keep-out region: 15.5,12.278 15.128,12.315 14.769,12.424 14.439,12.6 14.15,12.837 13.913,13.127 13.736,13.457 13.627,13.815 13.591,14.187 13.627,14.56 13.736,14.918 13.854,15.138 13.854,15.138 13.913,15.248 14.15,15.538 14.439,15.775 14.769,15.951 15.128,16.06 15.5,16.097 15.872,16.06 16.231,15.951 16.561,15.775 16.85,15.538 17.087,15.248 17.146,15.138 17.146,15.138 17.264,14.918 17.373,14.56 17.409,14.187 17.373,13.815 17.264,13.457 17.087,13.127 16.85,12.837 16.561,12.6 16.231,12.424 15.872,12.315 15.5,12.278
  Multi-Layer keep-out region: -15.5,12.278 -15.872,12.315 -16.231,12.424 -16.561,12.6 -16.85,12.837 -17.087,13.127 -17.264,13.457 -17.372,13.815 -17.409,14.187 -17.372,14.56 -17.264,14.918 -17.146,15.138 -17.146,15.138 -17.087,15.248 -16.85,15.537 -16.561,15.775 -16.231,15.951 -15.872,16.06 -15.5,16.097 -15.128,16.06 -14.769,15.951 -14.439,15.775 -14.15,15.537 -13.913,15.248 -13.854,15.138 -13.854,15.138 -13.736,14.918 -13.628,14.56 -13.591,14.187 -13.628,13.815 -13.736,13.457 -13.913,13.127 -14.15,12.837 -14.439,12.6 -14.769,12.424 -15.128,12.315 -15.5,12.278
  silkscreen extent -19.25,-19.56 19.25,20.81, body extent -20.54,-20.81 20.54,20.81, height 3.81
MTG320_620 [mm] "MTG320_620"
  round 6.2 / inner round 3.8 / far side round 6.2 hole 3.2: 1(0,0)
  BOTTOM keep-out region: 0,3.492 -0.546,3.449 -1.079,3.321 -1.585,3.111 -2.052,2.825 -2.469,2.469 -2.825,2.052 -3.111,1.585 -3.321,1.079 -3.449,0.546 -3.492,0 -3.449,-0.546 -3.321,-1.079 -3.111,-1.585 -3.016,-1.741 -3.016,-1.741 -2.825,-2.052 -2.469,-2.469 -2.052,-2.825 -1.585,-3.111 -1.079,-3.321 -0.546,-3.449 0,-3.492 0.546,-3.449 1.079,-3.321 1.585,-3.111 2.052,-2.825 2.469,-2.469 2.825,-2.052 3.016,-1.741 3.016,-1.741 3.111,-1.585 3.321,-1.079 3.449,-0.546 3.492,0 3.449,0.546 3.321,1.079 3.111,1.585 2.825,2.052 2.469,2.469 2.052,2.825 1.585,3.111 1.079,3.321 0.546,3.449 0,3.492
  Multi-Layer keep-out region: 0,3.492 -0.546,3.449 -1.079,3.321 -1.585,3.111 -2.052,2.825 -2.469,2.469 -2.825,2.052 -3.111,1.585 -3.321,1.079 -3.449,0.546 -3.492,0 -3.449,-0.546 -3.321,-1.079 -3.111,-1.585 -3.016,-1.741 -3.016,-1.741 -2.825,-2.052 -2.469,-2.469 -2.052,-2.825 -1.585,-3.111 -1.079,-3.321 -0.546,-3.449 0,-3.492 0.546,-3.449 1.079,-3.321 1.585,-3.111 2.052,-2.825 2.469,-2.469 2.825,-2.052 3.016,-1.741 3.016,-1.741 3.111,-1.585 3.321,-1.079 3.449,-0.546 3.492,0 3.449,0.546 3.321,1.079 3.111,1.585 2.825,2.052 2.469,2.469 2.052,2.825 1.585,3.111 1.079,3.321 0.546,3.449 0,3.492
  silkscreen extent -3.32,-3.33 3.32,3.33, body extent -4.4,-4.4 4.4,4.4, height 3.81
OPTO_TLP293_BL-TPL_E#1 [mm] "OPTO_TLP293_BL-TPL_E"
  rect 0.8x1.2 smd: 1(-0.635,-3.15) 2(0.635,-3.15) 3(0.635,3.15) 4(-0.635,3.15)
  TOP lines w0.508: 0.635,-3.15 0.635,-4.36
  silkscreen extent -1.83,-3.4 1.42,2.4, body extent -1.7,-4 1.7,4, height 3.81
OPTO_TLP293_BL-TPL_E#2 [mm] "OPTO_TLP293_BL-TPL_E"
  rect 0.8x1.2 smd: 1(-0.635,-3.15) 2(0.635,-3.15) 3(0.635,3.15) 4(-0.635,3.15)
  silkscreen extent -1.76,-3.4 1.42,2.4, body extent -1.7,-4 1.7,4, height 3.81
RELAY_G6K-2F-Y-DC12#1 [mm] "RELAY_G6K-2F-Y-DC12"
  rect 0.8x1.8 smd: 1(-3.8,-3.5) 2(-0.6,-3.5) 3(1.6,-3.5) 4(3.8,-3.5) 5(3.8,3.5) 6(1.6,3.5) 7(-0.6,3.5) 8(-3.8,3.5)
  silkscreen extent -5.1,-5.22 5.1,3.35, body extent -5.37,-4.65 5.37,4.65, height 3.81
RELAY_G6K-2F-Y-DC12#2 [mm] "RELAY_G6K-2F-Y-DC12"
  rect 0.8x1.8 smd: 1(-3.8,-3.5) 2(-0.6,-3.5) 3(1.6,-3.5) 4(3.8,-3.5) 5(3.8,3.5) 6(1.6,3.5) 7(-0.6,3.5) 8(-3.8,3.5)
  TOP lines w0.508: -3.8,-3.5 -3.8,-5.607
  silkscreen extent -5.1,-5.22 5.1,3.35, body extent -5.37,-4.65 5.37,4.65, height 3.81
RELAY_G6L-1F-DC12 [mm] "RELAY_G6L-1F-DC12"
  rect 0.8x2.66 smd: 2(-1.27,-3.37) 4(3.81,-3.37) 5(3.81,3.37) 8(-3.81,3.37)
  silkscreen extent -5.4,-3.6 5.4,3.6, body extent -5.67,-4.95 5.67,4.95, height 3.81
RESC1005X40N_A#1 [mm] "RESC1005X40N_A"
  rect 0.4x0.6 smd: 1(-0.45,0) 2(0.45,0)
  TOP keep-out region: -0.25,0.3 -0.25,-0.3 0.25,-0.3 0.25,0.3
  silkscreen extent -0.52,-0.52 0.52,0.52, body extent -0.9,-0.55 0.9,0.55, height 3.81
RESC1005X40N_A#2 [mm] "RESC1005X40N_A"
  rect 0.4x0.6 smd: 1(0.45,0) 2(-0.45,0)
  TOP keep-out region: 0.25,-0.3 0.25,0.3 -0.25,0.3 -0.25,-0.3
  silkscreen extent -0.52,-0.52 0.52,0.52, body extent -0.9,-0.55 0.9,0.55, height 3.81
RESC1608X55N_A#1 [mm] "RESC1608X55N_A"
  rect 0.8x0.95 smd: 1(0.8,0) 2(-0.8,0)
  TOP keep-out region: 0.357,-0.394 0.357,0.404 -0.339,0.404 -0.339,-0.394
  silkscreen extent -0.85,-0.7 0.85,0.7, body extent -1.45,-0.72 1.45,0.72, height 3.81
RESC1608X55N_A#2 [mm] "RESC1608X55N_A"
  rect 0.8x0.95 smd: 1(-0.8,0) 2(0.8,0)
  TOP keep-out region: -0.357,0.394 -0.357,-0.404 0.339,-0.404 0.339,0.394
  silkscreen extent -0.85,-0.7 0.85,0.7, body extent -1.45,-0.72 1.45,0.72, height 3.81
RESC1608X55N_B#1 [mm] "RESC1608X55N_B"
  rect 0.75x1 smd: 1(-0.75,0) 2(0.75,0)
  TOP keep-out region: -0.357,0.436 -0.357,-0.438 0.339,-0.438 0.339,0.436
  silkscreen extent -0.85,-0.72 0.85,0.72, body extent -1.28,-0.75 1.28,0.75, height 3.81
RESC1608X55N_B#2 [mm] "RESC1608X55N_B"
  rect 0.75x1 smd: 1(0.75,0) 2(-0.75,0)
  TOP keep-out region: 0.357,-0.436 0.357,0.438 -0.339,0.438 -0.339,-0.436
  silkscreen extent -0.85,-0.72 0.85,0.72, body extent -1.28,-0.75 1.28,0.75, height 3.81
SODFL2514X80N_2K [mm] "SODFL2514X80N_2K"
  rect 0.8x1.1 smd: 1(-1.15,0) 2(1.15,0)
  TOP keep-out region: -0.625,-0.75 -0.625,0.75 0.625,0.75 0.625,-0.75
  TOP keep-out region: -0.625,-0.75 -0.625,0.75 0.625,0.75 0.625,-0.75
  silkscreen extent -2.46,-0.78 1.06,3.59, body extent -1.8,-1.02 1.8,1.02, height 3.81
SOIC127P600X175-8N_TI [mm] "SOIC127P600X175-8N_TI"
  rrect17% 0.6x1.55 smd: 1(-1.905,-2.7) 2(-0.635,-2.7) 3(0.635,-2.7) 4(1.905,-2.7) 5(1.905,2.7) 6(0.635,2.7) 7(-0.635,2.7) 8(-1.905,2.7)
  silkscreen extent -3.32,-3.05 2.5,2, body extent -2.78,-3.73 2.78,3.73, height 3.81
SOIC127P600X175-16N_TI [mm] "SOIC127P600X175-16N_TI"
  rect 0.6x1.55 smd: 1(-4.445,-2.7) 2(-3.175,-2.7) 3(-1.905,-2.7) 4(-0.635,-2.7) 5(0.635,-2.7) 6(1.905,-2.7) 7(3.175,-2.7) 8(4.445,-2.7) 9(4.445,2.7) 10(3.175,2.7) 11(1.905,2.7) 12(0.635,2.7) 13(-0.635,2.7) 14(-1.905,2.7) 15(-3.175,2.7) 16(-4.445,2.7)
  silkscreen extent -6.05,-2.99 5,2, body extent -5.27,-3.73 5.27,3.73, height 3.81
SOT95P237X122-3N_OSI [mm] "SOT95P237X122-3N_OSI"
  rect 0.8x0.9 smd: 1(0.95,-1) 2(-0.95,-1) 3(0,1)
  silkscreen extent -1.52,-1.21 2.34,0.7, body extent -1.79,-1.7 1.79,1.7, height 3.81
TPC160H100 [mm] "TPC160H100"
  round 1.6 hole 1: 1(0,0)
  BOTTOM keep-out region: 1.181,-1.181 1.181,1.181 -1.181,1.181 -1.181,-1.181
  Multi-Layer keep-out region: 1.181,1.181 1.181,-1.181 -1.181,-1.181 -1.181,1.181
  silkscreen extent -1.25,-1.25 1.25,1.25, body extent -2.56,-2.56 2.56,2.56, height 3.81
TSSOP65P640X120-16N_B [mm] "TSSOP65P640X120-16N_B"
  rrect22% 1.5x0.45 smd: 1(2.9,-2.275) 2(2.9,-1.625) 3(2.9,-0.975) 4(2.9,-0.325) 5(2.9,0.325) 6(2.9,0.975) 7(2.9,1.625) 8(2.9,2.275) 9(-2.9,2.275) 10(-2.9,1.625) 11(-2.9,0.975) 12(-2.9,0.325) 13(-2.9,-0.325) 14(-2.9,-0.975) 15(-2.9,-1.625) 16(-2.9,-2.275)
  silkscreen extent -2.25,-3.23 3.45,2.72, body extent -3.9,-2.82 3.9,2.82, height 3.81
VSSOP50P490X110-10N [mm] "VSSOP50P490X110-10N"
  rect 1.45x0.3 smd: 1(2.2,-1) 2(2.2,-0.5) 3(2.2,0) 4(2.2,0.5) 5(2.2,1) 6(-2.2,1) 7(-2.2,0.5) 8(-2.2,0) 9(-2.2,-0.5) 10(-2.2,-1)
  silkscreen extent -1.55,-2.11 2.44,1.55, body extent -3.17,-1.82 3.17,1.82, height 3.81
WSON100P300X300X92-7N [mm] "WSON100P300X300X92-7N"
  rrect25% 0.6x0.4 smd: 1(-1.4,1) 2(-1.4,0) 3(-1.4,-1) 4(1.4,-1) 5(1.4,0) 6(1.4,1)
  rrect7% 1.5x2.4 smd: 7(0,0)
  silkscreen extent -1.8,-1.55 1.55,2.21, body extent -1.95,-1.82 1.95,1.82, height 3.81

## Via types
v1: diameter 24/26/26/24 (per signal layer), hole 12, TOP to BOTTOM, 110 vias
v2: diameter 20/22/22/20 (per signal layer), hole 12, TOP to BOTTOM, 27 vias

## Nets (pads, with @x,y where several pads share a name; then routed paths per layer and width w, separated by ;. In a path a pad name is that pad's centre, name@x,y a point inside that pad or via, vN(x,y) a via of type N, cw(c..) or ccw(c..) an arc to the next point about the centre after c; other vN are vias at no path point)
12V_START1: J1.14 J2.6 | length 213.9
  L2_PWR w15: 4127.57,4637.42 J2.6@4165.39,4675.23 ; 4127.57,4713.05 J2.6@4165.39,4675.23 ; 4203.21,4637.42 J2.6@4165.39,4675.23 ; 4203.21,4713.05 J2.6@4165.39,4675.23
  other v1: 3100.62,5.42 3121,41
"+5V USB": J2.2 L22.2 TP1.1 | length 309.4
  BOTTOM w35: 3672.8,3814.45 TP1.1@3709.1,3850.75 ; 3672.8,3887.04 TP1.1@3709.1,3850.75 ; 3745.39,3814.45 TP1.1@3709.1,3850.75 ; 3745.39,3887.04 TP1.1@3709.1,3850.75 ; 4114.74,4281.53 J2.2@4165.39,4281.53 4116.21,4260.51
CHASSIS_GND: C30.1 C31.1 C32.1 MH1.1 MH2.1 MH3.1 MH4.1 MH5.1 MH6.1 MH7.1 MH8.1 | length 10493
  TOP w30: 118.1,-20.95 MH3.1@118.1,118.1 ; 118.1,257.15 MH3.1@118.1,118.1 ; 118.1,5372.81 MH1.1@118.1,5511.86 ; 118.1,5650.91 MH1.1@118.1,5511.86 ; 257.15,118.1 MH3.1@118.1,118.1 ; 257.15,5511.86 MH1.1@118.1,5511.86 ; 293.37,-307.03 MH7.1@393.69,-206.7 ; 293.37,-106.38 MH7.1@393.69,-206.7 ; 293.37,5736.34 MH5.1@393.69,5836.66 ; 293.37,5936.98 MH5.1@393.69,5836.66 ; 494.01,-307.03 MH7.1@393.69,-206.7 ; 494.01,-106.38 MH7.1@393.69,-206.7 ; 494.01,5736.34 MH5.1@393.69,5836.66 ; 494.01,5936.98 MH5.1@393.69,5836.66 ; 4033.59,-307.03 MH8.1@4133.91,-206.7 ; 4033.59,-106.38 MH8.1@4133.91,-206.7 ; 4033.59,5736.34 MH6.1@4133.91,5836.66 ; 4033.59,5936.98 MH6.1@4133.91,5836.66 ; 4234.23,-307.03 MH8.1@4133.91,-206.7 ; 4234.23,-106.38 MH8.1@4133.91,-206.7 ; 4234.23,5736.34 MH6.1@4133.91,5836.66 ; 4234.23,5936.98 MH6.1@4133.91,5836.66 ; 4270.45,118.1 MH4.1@4409.5,118.1 ; 4270.45,5511.86 MH2.1@4409.5,5511.86 ; 4409.5,-20.95 MH4.1@4409.5,118.1 ; 4409.5,257.15 MH4.1@4409.5,118.1 ; 4409.5,5372.81 MH2.1@4409.5,5511.86 ; 4409.5,5650.91 MH2.1@4409.5,5511.86
  L3_GND w30: 118.1,26.29 MH3.1@118.1,118.1 ; 118.1,209.9 MH3.1@118.1,118.1 ; 118.1,5420.05 MH1.1@118.1,5511.86 ; 118.1,5603.66 MH1.1@118.1,5511.86 ; 209.9,118.1 MH3.1@118.1,118.1 ; 209.9,5511.86 MH1.1@118.1,5511.86 ; 326.77,-273.62 MH7.1@393.69,-206.7 ; 326.77,-139.79 MH7.1@393.69,-206.7 ; 326.77,5769.74 MH5.1@393.69,5836.66 ; 326.77,5903.58 MH5.1@393.69,5836.66 ; 460.6,-273.62 MH7.1@393.69,-206.7 ; 460.6,-139.79 MH7.1@393.69,-206.7 ; 460.6,5769.74 MH5.1@393.69,5836.66 ; 460.6,5903.58 MH5.1@393.69,5836.66 ; 4066.99,-273.62 MH8.1@4133.91,-206.7 ; 4066.99,-139.79 MH8.1@4133.91,-206.7 ; 4066.99,5769.74 MH6.1@4133.91,5836.66 ; 4066.99,5903.58 MH6.1@4133.91,5836.66 ; 4200.82,-273.62 MH8.1@4133.91,-206.7 ; 4200.82,-139.79 MH8.1@4133.91,-206.7 ; 4200.82,5769.74 MH6.1@4133.91,5836.66 ; 4200.82,5903.58 MH6.1@4133.91,5836.66 ; 4317.69,118.1 MH4.1@4409.5,118.1 ; 4317.69,5511.86 MH2.1@4409.5,5511.86 ; 4409.5,26.29 MH4.1@4409.5,118.1 ; 4409.5,209.9 MH4.1@4409.5,118.1 ; 4409.5,5420.05 MH2.1@4409.5,5511.86 ; 4409.5,5603.66 MH2.1@4409.5,5511.86
  BOTTOM w15: 118.1,-20.95 MH3.1@118.1,118.1 ; 118.1,257.15 MH3.1@118.1,118.1 ; 118.1,5372.81 MH1.1@118.1,5511.86 ; 118.1,5650.91 MH1.1@118.1,5511.86 ; 257.15,118.1 MH3.1@118.1,118.1 ; 257.15,5511.86 MH1.1@118.1,5511.86 ; 293.37,-307.03 MH7.1@393.69,-206.7 ; 293.37,-106.38 MH7.1@393.69,-206.7 ; 293.37,5736.34 MH5.1@393.69,5836.66 ; 293.37,5936.98 MH5.1@393.69,5836.66 ; 494.01,-307.03 MH7.1@393.69,-206.7 ; 494.01,-106.38 MH7.1@393.69,-206.7 ; 494.01,5736.34 MH5.1@393.69,5836.66 ; 494.01,5936.98 MH5.1@393.69,5836.66 ; 4033.59,-307.03 MH8.1@4133.91,-206.7 ; 4033.59,-106.38 MH8.1@4133.91,-206.7 ; 4033.59,5736.34 MH6.1@4133.91,5836.66 ; 4033.59,5936.98 MH6.1@4133.91,5836.66 ; 4234.23,-307.03 MH8.1@4133.91,-206.7 ; 4234.23,-106.38 MH8.1@4133.91,-206.7 ; 4234.23,5736.34 MH6.1@4133.91,5836.66 ; 4234.23,5936.98 MH6.1@4133.91,5836.66 ; 4270.45,118.1 MH4.1@4409.5,118.1 ; 4270.45,5511.86 MH2.1@4409.5,5511.86 ; 4409.5,-20.95 MH4.1@4409.5,118.1 ; 4409.5,257.15 MH4.1@4409.5,118.1 ; 4409.5,5372.81 MH2.1@4409.5,5511.86 ; 4409.5,5650.91 MH2.1@4409.5,5511.86
DM_RELAY_1: J1.5 R17.2 TP19.1 | length 6779.4
  TOP w8.26: TP19.1@1650.1,4067.75 793.75,4067.75 647,3921 647,1776 1361,1062 2984,1062 3143.26,902.74 3143.26,650.26 v2(3083,590)
  BOTTOM w8.26: TP19.1@1650.1,4067.75 1651.59,4069.24 R17.2@1840.1,4069.24 ; J1.5@3055.17,417.31 3055.17,454 3055.17,532.17 3083,560 v2(3083,590)
DM_RELAY_2: J1.6 R19.2 TP20.1 | length 7174.8
  TOP w8.26: TP20.1@1645.1,4557.75 1407.35,4320 862,4320 590,4048 590,1701 1318,973 3011,973 3117,867 3117,662.01 v2(3046.01,591.03)
  BOTTOM w8.26: TP20.1@1645.1,4557.75 1848.6,4557.75 R19.2@1850.1,4559.24 ; J1.6@3035.49,417.31 3035.49,580.5 v2(3046.01,591.03)
GND: C1.2 C2.2 C3.2 C4.2 C5.2 C6.1 C7.2 C8.2 C9.2 C10.2 C11.2 C12.2 C13.2 C14.2 C15.1 C16.1 C17.1 C18.2 C19.2 C20.2 C21.2 C22.2 C23.2 C24.2 C25.2 C26.1 C27.1 C30.2 C31.2 C32.2 C33.2 C34.2 J1.1 J1.P3 J1.SH1 J1.SH2 J1.SH3 J1.SH4 J2.1 J2.7 J2.14 Q1.2 Q2.2 Q3.3 Q4.3 R31.2 R33.2 R35.2 R37.2 U1.1 U2.2 U2.8 U5.8 U11.1 U11.3 U12.2 U12.3 U12.7 | length 4485.8
  TOP w15: 2702.76,275.62 J1.SH4@2736.27,242.11 2736.27,286.67 ; 2702.76,310.97 J1.SH2@2736.27,344.48 2702.76,377.98 ; 3196.04,136.92 J1.P3@3232.34,173.22 ; 3196.04,209.51 J1.P3@3232.34,173.22 ; 3268.63,136.92 J1.P3@3232.34,173.22 ; 3268.63,209.51 J1.P3@3232.34,173.22 ; 3320.87,208.6 J1.SH3@3354.38,242.11 ; 3320.87,275.62 J1.SH3@3354.38,242.11 ; 3320.87,310.97 J1.SH1@3354.38,344.48 ; 3387.89,208.6 J1.SH3@3354.38,242.11 ; 3387.89,275.62 J1.SH3@3354.38,242.11 ; 3387.89,310.97 J1.SH1@3354.38,344.48 ; 3387.89,377.98 J1.SH1@3354.38,344.48 ; 4114.93,4157.88 J2.1@4165.39,4183.11 4114.93,4183.11 ; 4127.57,4735.84 J2.7@4165.39,4773.66 4203.21,4735.84
  L3_GND w15: 2702.76,208.6 J1.SH4@2736.27,242.11 ; 2702.76,275.62 J1.SH4@2736.27,242.11 ; 2702.76,310.97 J1.SH2@2736.27,344.48 ; 2702.76,377.98 J1.SH2@2736.27,344.48 ; 2769.78,208.6 J1.SH4@2736.27,242.11 ; 2769.78,275.62 J1.SH4@2736.27,242.11 ; 2769.78,310.97 J1.SH2@2736.27,344.48 ; 2769.78,377.98 J1.SH2@2736.27,344.48 ; 3196.04,136.92 J1.P3@3232.34,173.22 ; 3196.04,209.51 J1.P3@3232.34,173.22 ; 3268.63,136.92 J1.P3@3232.34,173.22 ; 3268.63,209.51 J1.P3@3232.34,173.22 ; 3320.87,208.6 J1.SH3@3354.38,242.11 ; 3320.87,275.62 J1.SH3@3354.38,242.11 ; 3320.87,310.97 J1.SH1@3354.38,344.48 ; 3320.87,377.98 J1.SH1@3354.38,344.48 ; 3387.89,208.6 J1.SH3@3354.38,242.11 ; 3387.89,275.62 J1.SH3@3354.38,242.11 ; 3387.89,310.97 J1.SH1@3354.38,344.48 ; 3387.89,377.98 J1.SH1@3354.38,344.48 ; 4127.57,4735.84 J2.7@4165.39,4773.66 ; 4127.57,4811.48 J2.7@4165.39,4773.66 ; 4127.71,4145.42 J2.1@4165.39,4183.11 ; 4127.71,4220.8 J2.1@4165.39,4183.11 ; 4203.08,4145.42 J2.1@4165.39,4183.11 ; 4203.08,4220.8 J2.1@4165.39,4183.11 ; 4203.21,4735.84 J2.7@4165.39,4773.66 ; 4203.21,4811.48 J2.7@4165.39,4773.66 ; 4245.69,4538.99 J2.14@4283.5,4576.81 ; 4245.69,4614.63 J2.14@4283.5,4576.81 ; 4321.32,4538.99 J2.14@4283.5,4576.81 ; 4321.32,4614.63 J2.14@4283.5,4576.81
  BOTTOM w10: v1(2764,4272) 2777,4285 C7.2@2800.71,4285 ; U11.3@3123.36,4309.9 3076.1,4309.9 v1(3058,4328) 3079.27,4349.27 U11.1@3123.36,4349.27 ; J1.1@3133.91,417.31 3133.91,377.09 3146,365
  BOTTOM w15: v1(1059,4770) 1075.72,4786.72 U2.2@1124.27,4786.72 ; U2.8@1124.27,4633.18 v1(1177.8,4633.18) ; 2702.76,208.6 J1.SH4@2736.27,242.11 ; 2702.76,275.62 J1.SH4@2736.27,242.11 ; 2702.76,310.97 J1.SH2@2736.27,344.48 ; 2702.76,377.98 J1.SH2@2736.27,344.48 ; 2769.78,208.6 J1.SH4@2736.27,242.11 ; 2769.78,275.62 J1.SH4@2736.27,242.11 ; 2769.78,310.97 J1.SH2@2736.27,344.48 ; 2769.78,377.98 J1.SH2@2736.27,344.48 ; 3196.04,136.92 J1.P3@3232.34,173.22 ; 3196.04,209.51 J1.P3@3232.34,173.22 ; 3268.63,136.92 J1.P3@3232.34,173.22 ; 3268.63,209.51 J1.P3@3232.34,173.22 ; 3320.87,208.6 J1.SH3@3354.38,242.11 ; 3320.87,275.62 J1.SH3@3354.38,242.11 ; 3320.87,310.97 J1.SH1@3354.38,344.48 ; 3320.87,377.98 J1.SH1@3354.38,344.48 ; 3387.89,275.62 J1.SH3@3354.38,242.11 ; 3387.89,310.97 J1.SH1@3354.38,344.48 ; 3387.89,377.98 J1.SH1@3354.38,344.48 ; 4114.93,4132.64 J2.1@4165.39,4183.11 4215.86,4132.64 ; 4127.57,4735.84 J2.7@4165.39,4773.66 ; 4127.57,4811.48 J2.7@4165.39,4773.66 ; 4203.21,4735.84 J2.7@4165.39,4773.66 ; 4203.21,4811.48 J2.7@4165.39,4773.66 ; 4245.69,4538.99 J2.14@4283.5,4576.81 ; 4245.69,4614.63 J2.14@4283.5,4576.81 ; 4321.32,4538.99 J2.14@4283.5,4576.81 ; 4321.32,4614.63 J2.14@4283.5,4576.81
  BOTTOM w20: C8.2@3071.9,4720.54 v1(3109,4720.54)
  BOTTOM w25: Q2.2@2099.11,4372.75 v1(2146.74,4372.75)
  other v1: 1790,200 1795,259 327.71,508 4093.29,638 3285,1910 3217,1911 3218,2306 3294,2307 3291,2732 3222,2733 724.25,2826.52 1720.9,2826.52 1037.81,2866.27 1406.55,2869.03 2383.85,3048.11 3215,3127 3299,3128 1924,3438 1503,3475 1582,3476 1668,3477 1922,3512 1872,3548 1801,3550 3138.79,3632.87 3472,3882 3516,3882 2136.74,3887.75 1270,4148 1334,4149 1291,4931 1246,4932 1390,4934 1345,4935 326.71,4948
  other v2: 2964.9,4642.85 2945.22,4680.25 2984.59,4680.25 2964.9,4717.65
HV_GND: L16.1 R16.1 R16.2 R18.1 R18.2 TP18.1 U13.4 U14.4 | length 205.3
  BOTTOM w15: 1877.81,4152.45 TP18.1@1914.1,4188.75 ; 1877.81,4225.04 TP18.1@1914.1,4188.75 ; 1950.39,4152.45 TP18.1@1914.1,4188.75 ; 1950.39,4225.04 TP18.1@1914.1,4188.75
I2C2_SCL: J1.10 R2.2 U2.14 | length 7011
  TOP w8.26: v2(962.13,4761.13) 469,4268 469,1611 1235,845 3024,845 3063,806 3063,723 3045,705 v2(2921,705)
  BOTTOM w8.26: R2.2@785.78,4718.04 828.87,4761.13 U2.14@895.92,4761.13 v2(962.13,4761.13) ; v2(2921,705) 2921,617 2956.74,581.25 J1.10@2956.74,417.31
I2C2_SDA: J1.9 R3.2 U2.15 | length 6932.4
  TOP w8.26: v2(738.22,4798.22) 646.22,4798.22 351,4503 351,1503 1105,749 v2(2961,749)
  BOTTOM w8.26: v2(738.22,4798.22) R3.2@782.99,4798.22 794.48,4786.72 U2.15@895.92,4786.72 ; v2(2961,749) 2961,637 2976.43,621.57 J1.9@2976.43,417.31
I2C3_SCL: J1.12 R9.2 U11.10 U12.6 | length 5529.3
  TOP w8.26: v2(2738,4189) 2789,4189 2814,4214 2814,4300 2867.26,4353.26 v2@2897,4353.26 ; v2(2897,4353.72) v2@2897,4353.26 ; v2(3020.43,4510.57) 3020.43,4396.43 2977.26,4353.26 v2@2897,4353.26
  BOTTOM w8.26: v2(2738,4189) 2738,3961 2682.5,3905.5 2682.5,1559.5 3478,764 3478,240 3308,70 3156,70 3114.22,111.78 J1.12@3114.22,169.28 ; v2(2897,4353.72) 2901.45,4349.27 U11.10@2950.13,4349.27 ; U12.6@3020.02,4640.88 3020.43,4640.47 R9.2@3020.43,4552.25 v2(3020.43,4510.57)
I2C3_SDA: J1.11 R8.2 U11.9 U12.1 | length 5488.6
  TOP w8.26: v2(2771,4323) 2856.43,4408.43 v2(2856.43,4592.43)
  BOTTOM w8.26: v2(2856.43,4592.43) R8.2@2856.43,4640.25 2857.06,4640.88 U12.1@2909.78,4640.88 ; U11.9@2950.13,4329.59 2863.59,4329.59 2857,4323 v2(2771,4323) 2713,4265 2713,3987 2656,3930 2656,1541 3454,743 3454,247 3299,92 3160,92 3133.91,118.09 J1.11@3133.91,169.28
I2C_ADC_RDY: J1.13 R10.2 U11.2 | length 5533.4
  TOP w8.26: v2(2766,4156) 3055,4156 3172,4273 v2(3172,4364.9)
  BOTTOM w8.26: v2(2766,4156) 2759,4149 2759,3904 2703,3848 2703,1601 3515,789 3515,243 3314,42 3159,42 3096,105 3096,167.82 J1.13@3094.54,169.28 ; U11.2@3123.36,4329.59 3162,4329.59 3172,4339.59 v2(3172,4364.9) R10.2@3212.22,4364.9
I2C_ANI0: J2.15 L18.1 TP10.1 | length 2218.6
  BOTTOM w8.26: L18.1@3476.64,3191.14 TP10.1@3676.64,3191.14 3785.14,3191.14 3935,3341 3935,3984 4055,4104 4304,4104 4361,4161 4361,4614 4299.77,4675.23 J2.15@4283.5,4675.23
I2C_ANI0_IC: C19.1 D18.1 R11.2 R30.2 R31.1 TP14.1 | length 1539.9
  BOTTOM w8.26: R30.2@3221.6,3191.14 R31.1@3151.21,3191.14 3114.34,3191.14 C19.1@3086.13,3191.14 D18.1@2990.15,3191.14 TP14.1@2990.15,3341.14 2937,3394.29 2937,3862 3281,4206 3281,4299 3270.1,4309.9 R11.2@3249.47,4309.9
I2C_ANI1: J2.16 L19.1 TP11.1 | length 2812.5
  BOTTOM w8.26: L19.1@3476.64,2790.75 TP11.1@3676.64,2790.75 3836.75,2790.75 4027,2981 4027,3968 4108,4049 4332,4049 4417,4134 4417,4713 4356.34,4773.66 J2.16@4283.5,4773.66
I2C_ANI1_IC: C21.1 D19.1 R12.2 R32.2 R33.1 TP15.1 | length 2097.3
  BOTTOM w8.26: TP15.1@2990.15,2940.75 D19.1@2990.15,2790.75 ; R32.2@3221.6,2790.75 R33.1@3151.21,2790.75 C21.1@3086.13,2790.75 D19.1@2990.15,2790.75 ; R12.2@3249.47,4264.9 3249.47,4235.46 2881,3867 2881,2825 2915.25,2790.75 D19.1@2990.15,2790.75
I2C_ANI2: J2.17 L20.1 TP12.1 | length 3322.6
  BOTTOM w8.26: L20.1@3476.64,2365.35 TP12.1@3676.64,2365.35 4026.35,2365.35 4220,2559 4220,3675 4437,3892 4437,4774 4338.92,4872.09 J2.17@4283.5,4872.09
I2C_ANI2_IC: C23.1 D20.1 R13.2 R34.2 R35.1 TP16.1 | length 2353.3
  BOTTOM w8.26: R13.2@2826.03,4193.9 2826.03,2400.97 2861.65,2365.35 D20.1@2990.14,2365.35 ; TP16.1@2990.14,2515.35 D20.1@2990.14,2365.35 ; R34.2@3221.6,2365.35 R35.1@3151.21,2365.35 C23.1@3086.13,2365.35 D20.1@2990.14,2365.35
I2C_ANI3: J2.18 L21.1 TP13.1 | length 3868.8
  BOTTOM w8.26: L21.1@3476.64,1974.96 TP13.1@3676.64,1974.96 4094.96,1974.96 4336,2216 4336,3695 4456,3815 4456,4856 4341.49,4970.51 J2.18@4283.5,4970.51
I2C_ANI3_IC: C25.1 D21.1 R14.2 R36.2 R37.1 TP17.1 | length 2831.6
  BOTTOM w8.26: R14.2@2826.03,4238.9 2790.13,4203 2790.13,4135.13 2780.26,4125.26 2780.26,2047.74 2853.04,1974.96 D21.1@2990.15,1974.96 ; TP17.1@2990.15,2124.96 D21.1@2990.15,1974.96 ; R36.2@3221.6,1974.96 R37.1@3151.21,1974.96 C25.1@3086.13,1974.96 D21.1@2990.15,1974.96
I2C_THS_INT: J1.15 R15.1 U12.4 | length 7213.2
  TOP w8.26: v2(3059,4787.25) 3777.75,4787.25 3939,4626 4334,4626 4434,4526 4434,3538 4382,3486 4382,2118 4192,1928 4192,442 4041,291 3591,291 3398.01,98 3132.01,98 3066,32 v2(3063,32)
  BOTTOM w8.26: U12.4@3020.02,4719.62 3020.02,4786.84 R15.1@3020.43,4787.25 v2(3059,4787.25) ; J1.15@3055.17,169.28 3055.17,143 3055.17,39.83 v2(3063,32)
IOEXP_INT: J1.7 R28.2 U2.13 | length 6817.1
  TOP w8.26: v2(836,4724) 408,4296 408,1551 1166,793 3002,793 v2(3032,763)
  BOTTOM w8.26: R28.2@786.78,4645.1 836,4694.32 v2(836,4724) 847.54,4735.54 U2.13@895.92,4735.54 ; J1.7@3015.8,417.31 3015.8,611.8 3032,628 v2(3032,763)
IOEXP_RESET: J1.8 R29.2 U2.3 | length 7536.1
  TOP w8.26: v2(1447,4761.13) 1396.87,4711 988,4711 518,4241 518,1668 1272,914 3019,914 3091,842 3091,688 3056,653 v2(2996.11,653)
  BOTTOM w8.26: U2.3@1124.27,4761.13 v2(1447,4761.13) R29.2@1528.71,4761.13 ; J1.8@2996.11,417.31 v2(2996.11,653)
ISO_RELAY1_IN1: J2.3 U13.2 | length 2321.3
  BOTTOM w20: U13.2@2202.42,3987.75 2640.75,3987.75 2690,4037 2690,4326 2776,4412 4133.35,4412 J2.3@4165.39,4379.96
ISO_RELAY2_IN1: J2.4 U14.2 | length 1960.3
  BOTTOM w20: U14.2@2207.42,4472.75 4159.76,4472.75 J2.4@4165.39,4478.39
N03287: U2.5 U5.1 | length 621
  BOTTOM w8.26: U5.1@825.25,4249.4 825.25,4309.9 1009.1,4493.75 1009.1,4657.2 1061.85,4709.95 U2.5@1124.27,4709.95